# Altium PCB VC Pcb.PcbDoc
Units mm, origin at the board's own origin, x right, y up, seen from the top; angles counter-clockwise.
Board outline 105 x 73 mm, 4 copper layers (Top Layer, GND, 3V3, Bottom Layer), stack 1.248 mm thick; 33 components, 36 nets, 120 pads, 0 vias.
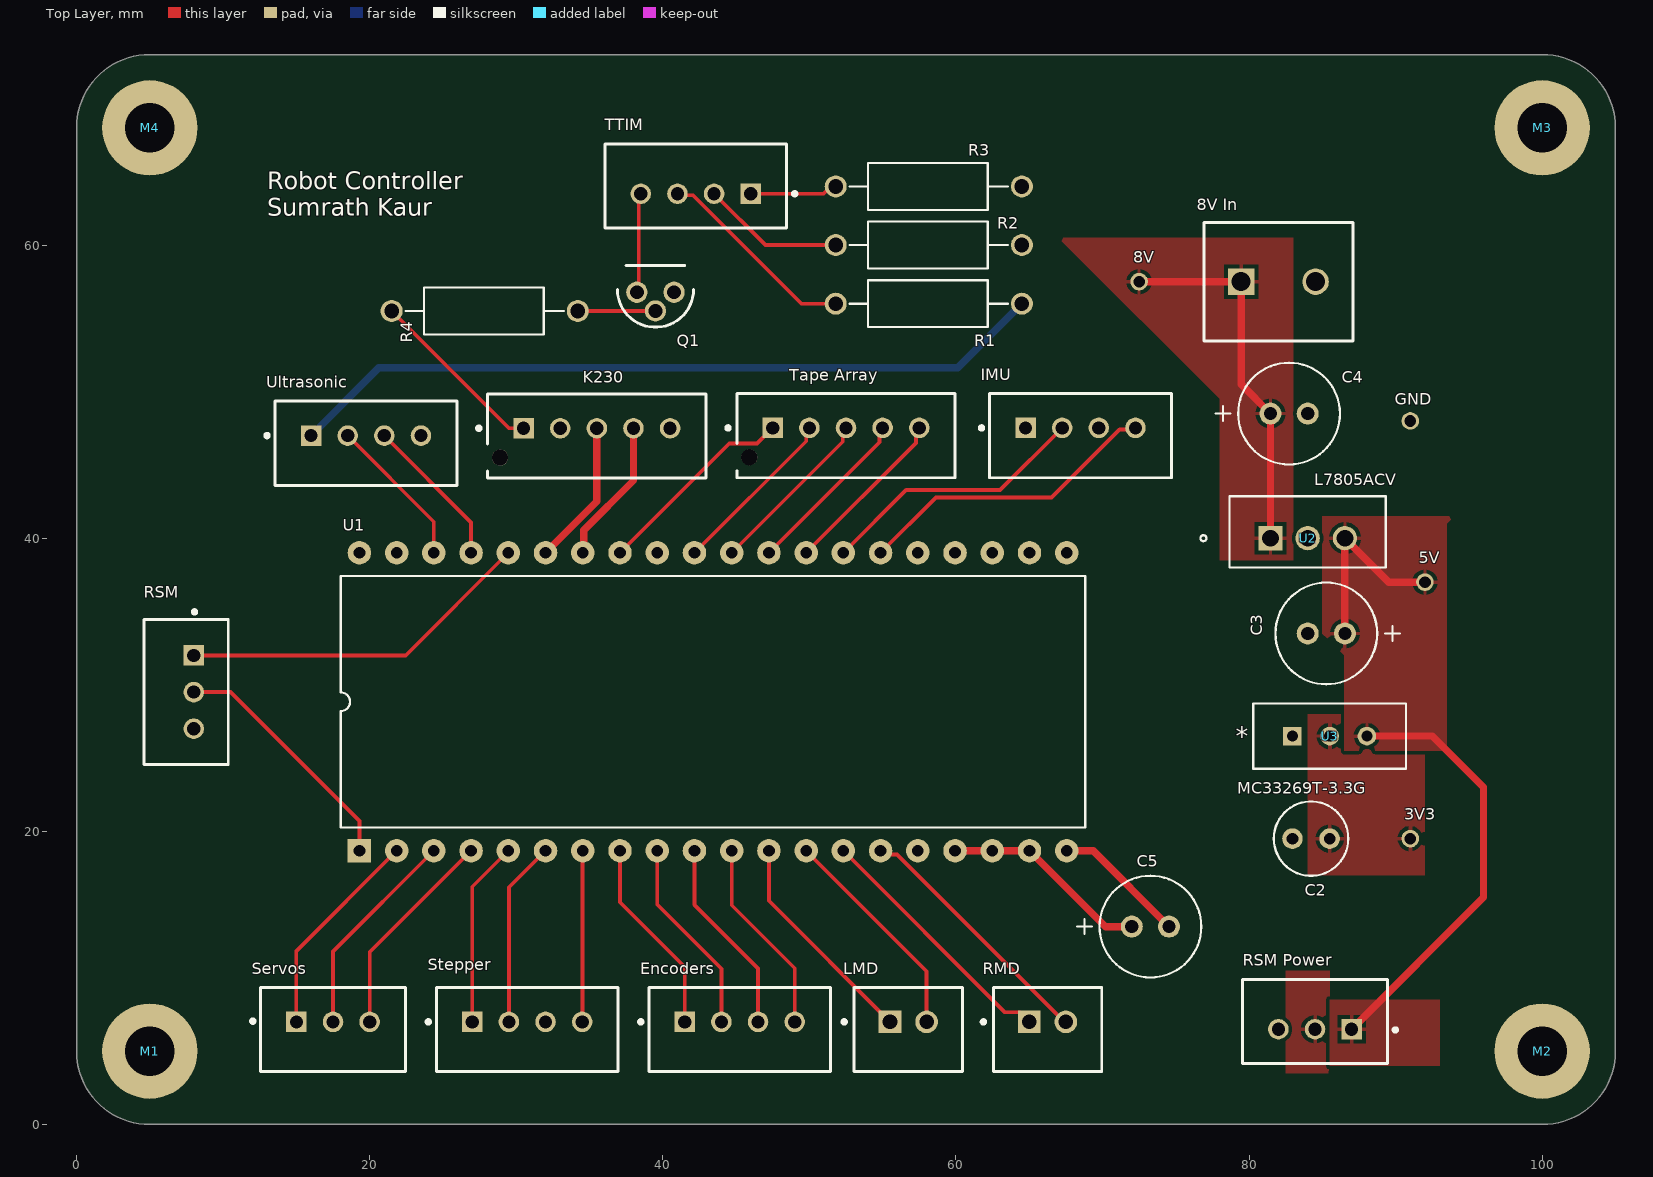
[diagram p0: Top Layer view]
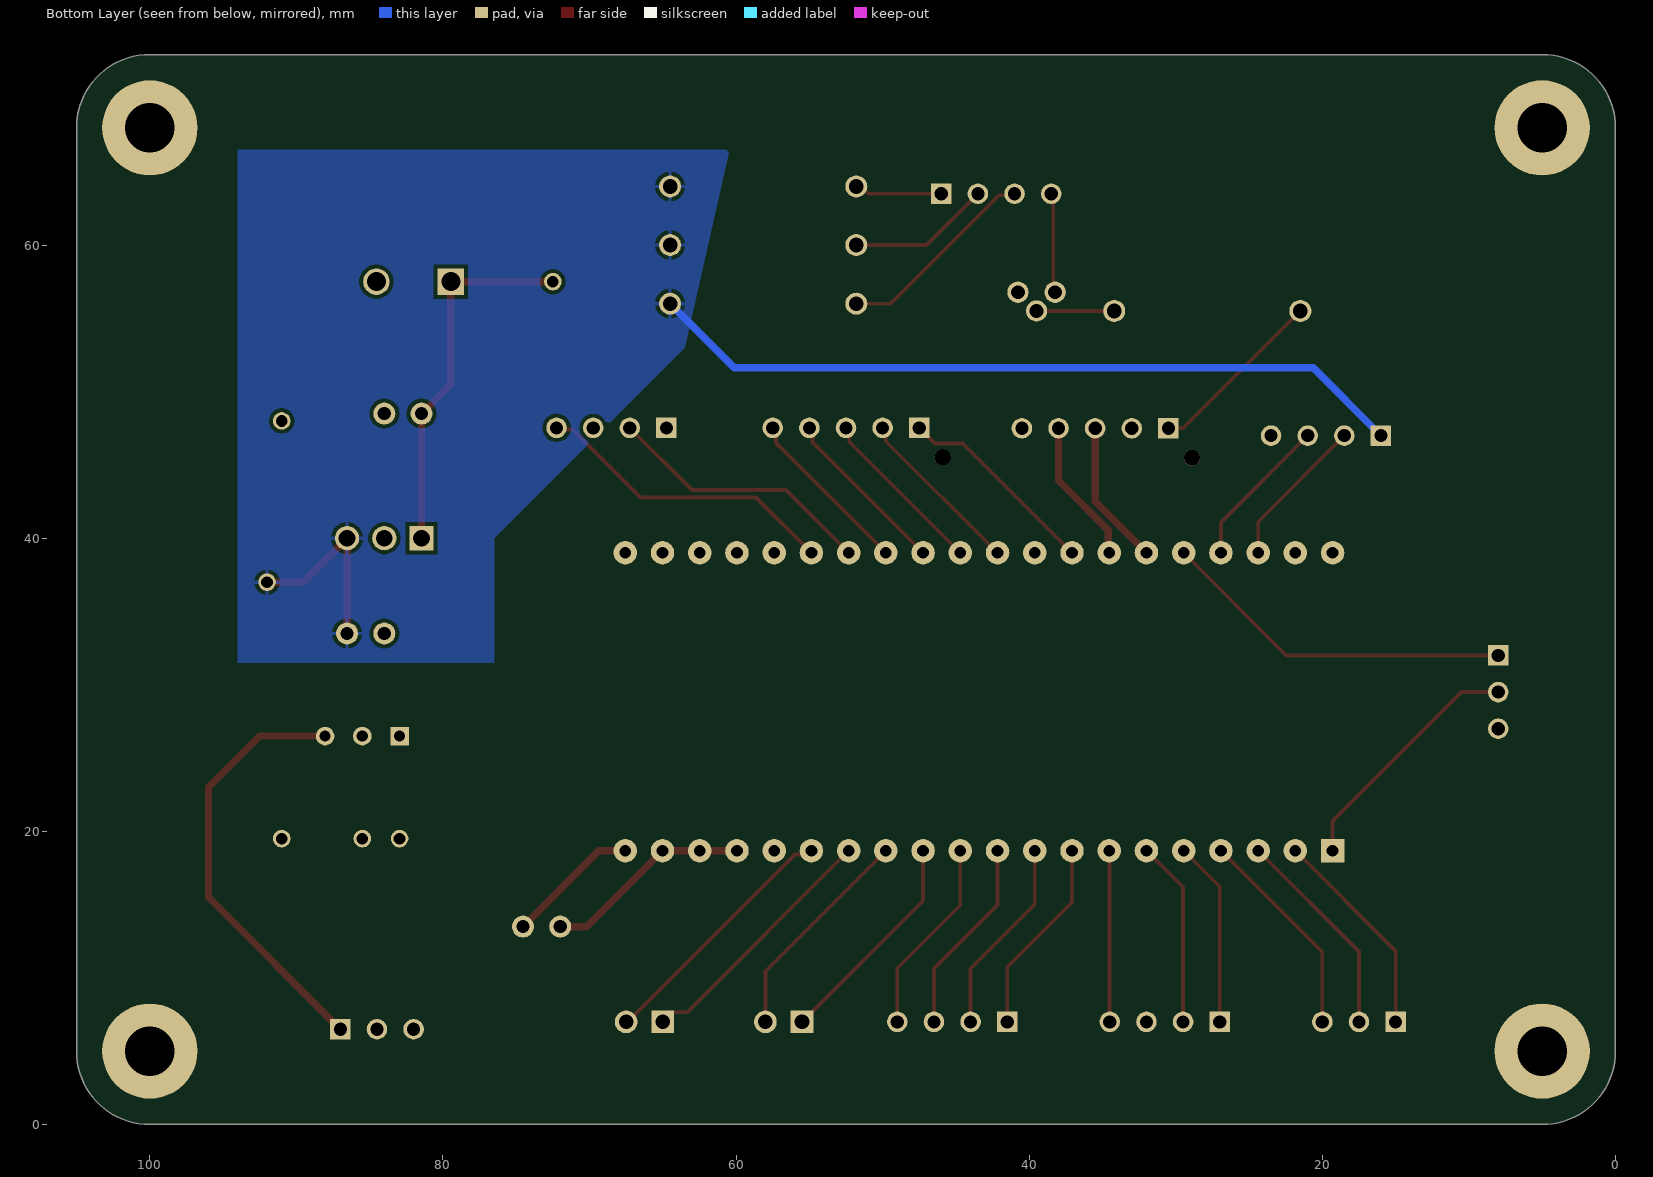
[diagram p1: Bottom Layer view, seen from below]
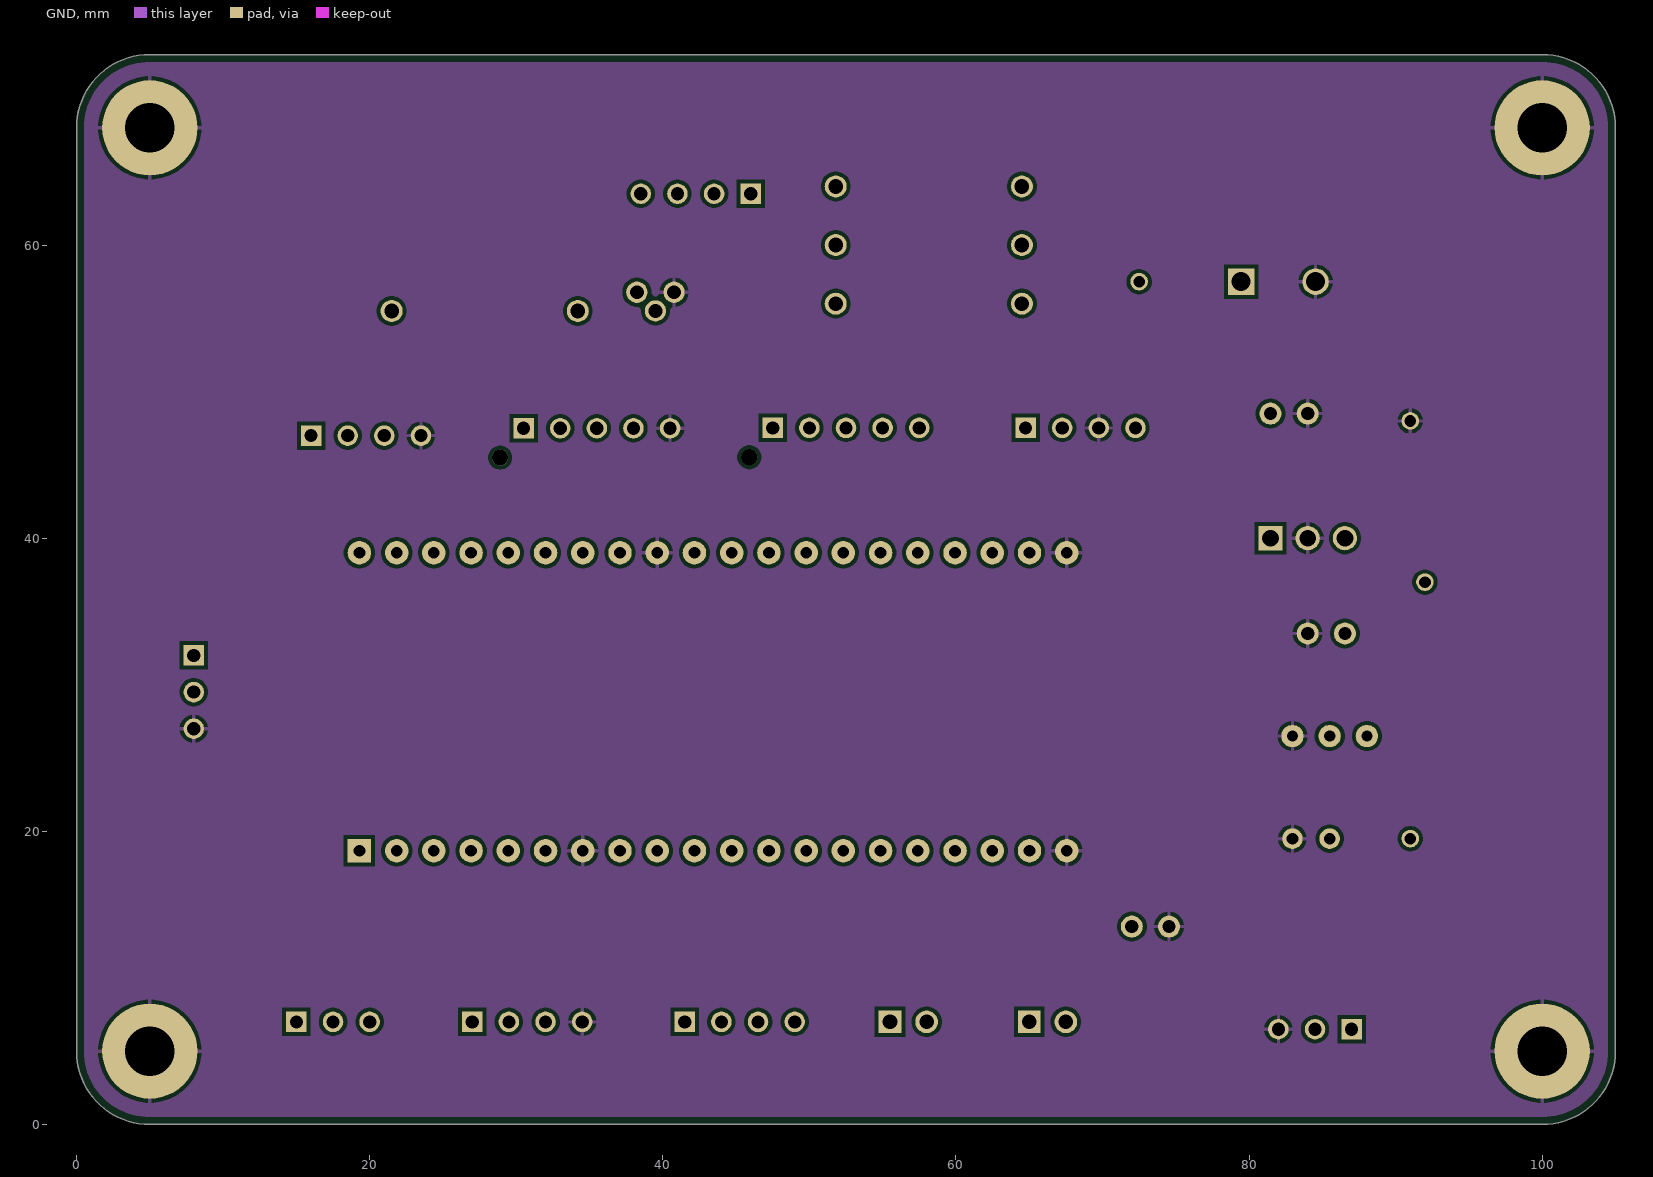
[diagram p2: GND]
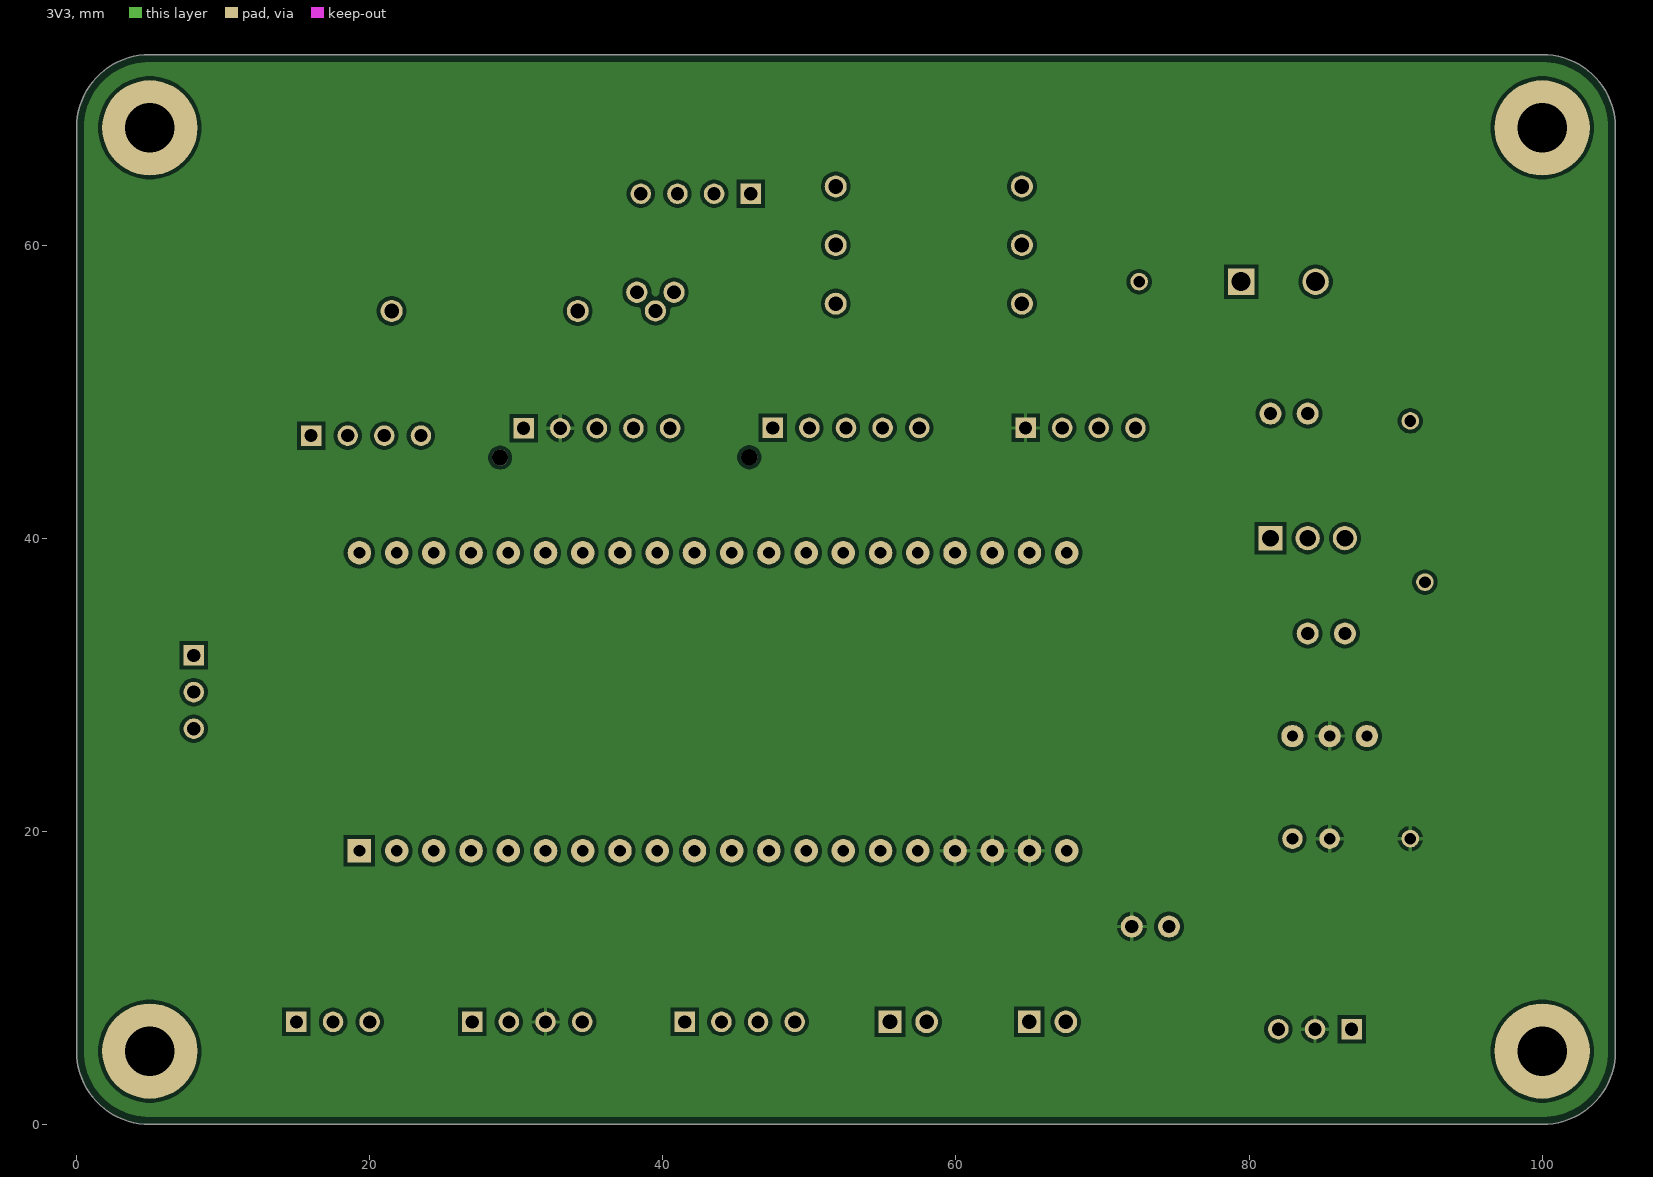
[diagram p3: 3V3]
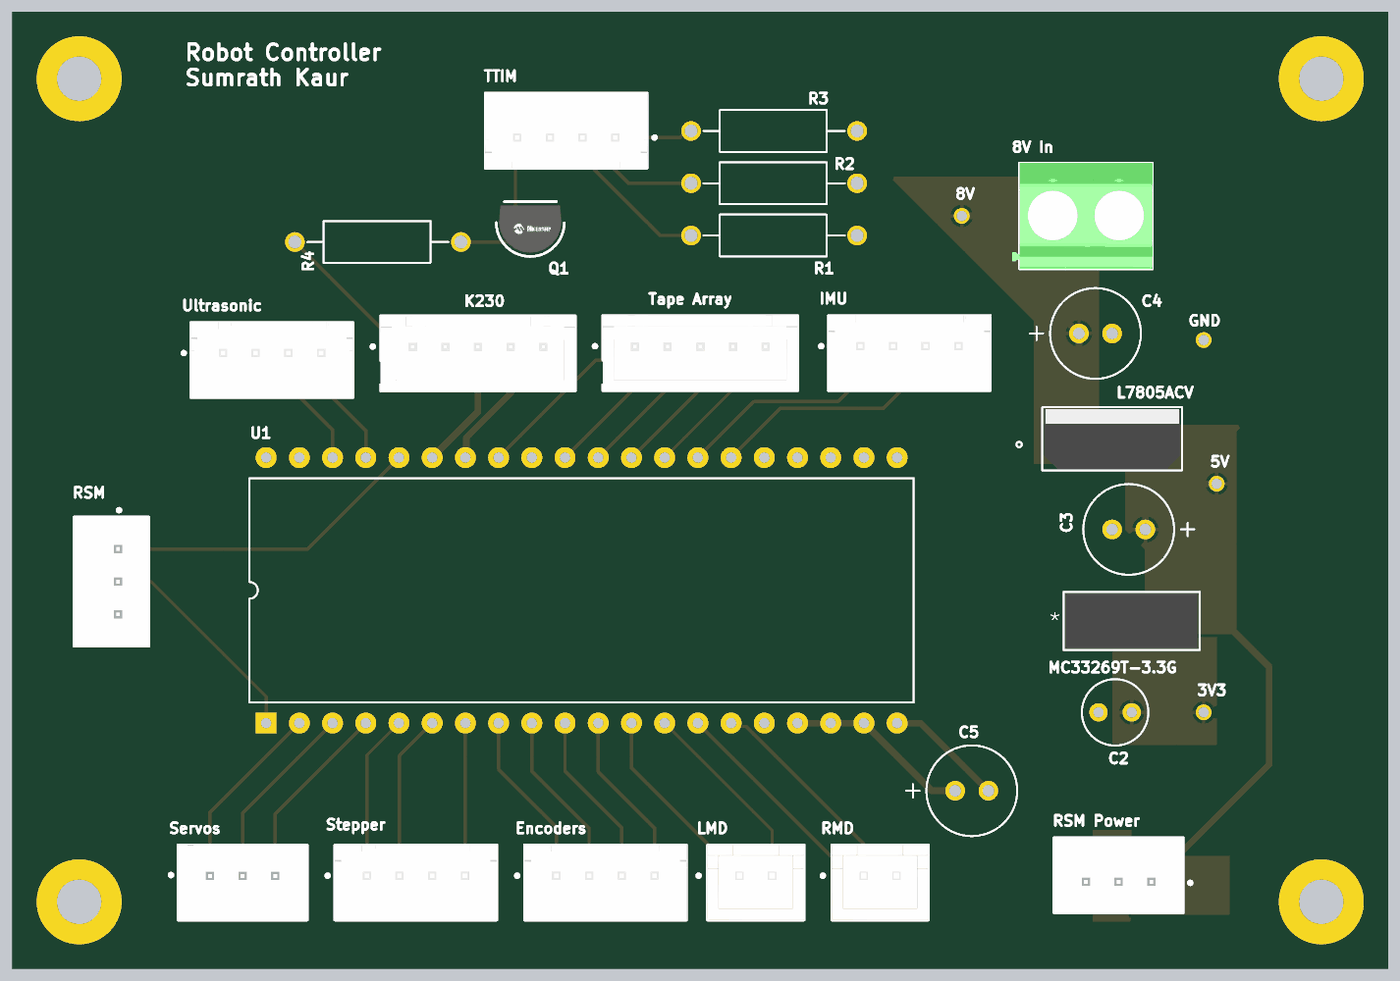
[diagram p4: 3D render of the assembled board from above, using the file's embedded part models]

## Layer stack, top to bottom
Top Solder: solder mask 0.0102, Solder Resist, Dk 3.5
Top Layer: signal copper 0.0356
Dielectric 2: prepreg 0.0711, PP-006, Dk 4.1
GND: signal copper 0.0175
Dielectric 1: dielectric 1, FR-4, Dk 4.8
3V3: signal copper 0.0175
Dielectric 3: prepreg 0.0711, PP-006, Dk 4.1
Bottom Layer: signal copper 0.0356
Bottom Solder: solder mask 0.0102, Solder Resist, Dk 3.5

## Board outline
5,0 cw(c5,5) 0,5 0,68 cw(c5,68) 5,73 100,73 cw(c100,68) 105,68 105,5 cw(c100,5) 100,0

## Design rules (kind name [scope] priority, off if disabled: settings)
BoardOutlineClearance [All] p1: gap=0.5 ignorepadtopadclearanceinfootprint=FALSE
Clearance [All] p1: gap=0.254 ignorepadtopadclearanceinfootprint=FALSE
PolygonConnect [All] p1: connectstyle=Relief reliefconductorwidth=0.254 reliefentries=4 polygonreliefangle="90 Angle" airgapwidth=0.254
RoutingVias [All] p1: holewidth=0.711 width=1.27 viastyle="Through Hole" minholewidth=0.711 minwidth=1.27 maxholewidth=0.711 maxwidth=1.27
SolderMaskExpansion [All] p1: expansion=0 istentingtop=FALSE
SupplyNets "Schematic Supply Nets_4" [InNet('3V3')] p1: voltage=0.000
SupplyNets "Schematic Supply Nets_2" [InNet('8V')] p2: voltage=0.000
SupplyNets "Schematic Supply Nets_1" [InNet('5V')] p3: voltage=0.000
SupplyNets "Schematic Supply Nets" [InNet('GND')] p4: voltage=0.000
Width [All] p1: maxlimit=0.5 minlimit=0.254 preferedwidth=0.254
30 further rules are at their usual default settings.

## Classes and differential pairs
component class "Top Level": C2 C3 C4 C5 GND Q1 R1 R2 R3 R4 U1 U2 U3

## Components (designator, comment, footprint, x,y, rotation, side; value= is the part's Value field where it differs from the comment)
3V3 "3V3" TESTPOINT 91,19.5 r180 top (schematic designator TP3)
5V "5V" TESTPOINT 92,37 r180 top (schematic designator TP2)
8V "8V" TESTPOINT 72.5,57.5 r180 top (schematic designator TP1)
"8V In" "1729128" PHOE-1729128-2_V 82,57.5 r0 top (schematic designator J13)
C2 "100 nF" "Generic small capacitor" 85.5,19.5 r180 top
C3 "470 nF" "small electrolytic cap" 86.54,33.5 r180 top
C4 "470 nF" "small electrolytic cap" 81.46,48.5 r0 top
C5 "470 nF" "small electrolytic cap" 72,13.5 r0 top
Encoders "Encoders" FP-B4B-XH-A_LF_SN-MFG 45.25,6.475 r180 top (schematic designator J1)
GND "GND" TESTPOINT 91,48 r90 top (schematic designator TP4)
IMU "IMU" FP-B4B-XH-A_LF_SN-MFG 68.5,47 r180 top (schematic designator J7)
K230 "K230" FP-B5B-XH-AM_LF_SN-MFG 35.5,46.975 r180 top (schematic designator J10)
LMD "LMD" FP-B2B-XH-A_LF_SN-MFG 56.75,6.475 r0 top (schematic designator J4)
M1 "M3 Mounting Hole Plated" "M3 Screw Hole - Plated" 5,5 r0 top
M2 "M3 Mounting Hole Plated" "M3 Screw Hole - Plated" 100,5 r0 top
M3 "M3 Mounting Hole Plated" "M3 Screw Hole - Plated" 100,68 r0 top
M4 "M3 Mounting Hole Plated" "M3 Screw Hole - Plated" 5,68 r0 top
Q1 "VN2222LL-G" FP-VN2222LL-G-MFG 39.5,56.5 r0 top
R1 "100R" "Axial 0.5" 64.5,56 r180 top
R2 "100R" "Axial 0.5" 64.5,60 r180 top
R3 "100R" "Axial 0.5" 64.5,64 r180 top
R4 "47R" "Axial 0.5" 34.2,55.5 r180 top
RMD "RMD" FP-B2B-XH-A_LF_SN-MFG 66.25,6.475 r0 top (schematic designator J5)
RSM "RSM" FP-B3B-XH-A_LF_SN-MFG 7.475,29.5 r270 top (schematic designator J9)
"RSM Power" "RSM Power" FP-B3B-XH-A_LF_SN-MFG 84.5,7.025 r180 top (schematic designator J3)
Servos "Servos" FP-B3B-XH-A_LF_SN-MFG 17.5,6.475 r0 top (schematic designator J2)
Stepper "Stepper" FP-B4B-XH-A_LF_SN-MFG 30.75,6.475 r180 top (schematic designator J6)
"Tape Array" "Tape Signals" FP-B5B-XH-AM_LF_SN-MFG 52.5,47 r180 top (schematic designator J11)
TTIM "TTIM" FP-B4B-XH-A_LF_SN-MFG 42.25,64.025 r0 top (schematic designator J12)
U1 "ESP32-S3" esp32 19.3,18.68 r90 top
U2 "L7805ACV" TO-220_STM 81.46,40 r0 top
U3 "MC33269T-3.3G" MC33269T-33 82.96,26.5 r0 top
Ultrasonic "Ultrasonic" FP-B4B-XH-A_LF_SN-MFG 19.75,46.475 r180 top (schematic designator J8)

## Footprints (in the part's own frame and the unit in brackets; to place one, negate y for a bottom-side part, rotate by r counter-clockwise, add the part's x,y. Pads: shape width x height; smd on the part's side, far side on the other; paste and mask are expansions set on the pad)
"Axial 0.5" [mm]
  round 1.5 hole 1: 1(0,0) 2(12.7,0)
  silkscreen extent 0.95,-1.6 11.75,1.6
esp32 [mm]
  rect 1.6x1.6 hole 0.8: 1(0,0)
  round 1.6 hole 0.8: 2(0,-2.54) 3(0,-5.08) 4(0,-7.62) 5(0,-10.16) 6(0,-12.7) 7(0,-15.24) 8(0,-17.78) 9(0,-20.32) 10(0,-22.86) 11(0,-25.4) 12(0,-27.94) 13(0,-30.48) 14(0,-33.02) 15(0,-35.56) 16(0,-38.1) 17(0,-40.64) 18(0,-43.18) 19(0,-45.72) 20(0,-48.26) 21(20.32,-48.26) 22(20.32,-45.72) 23(20.32,-43.18) 24(20.32,-40.64) 25(20.32,-38.1) 26(20.32,-35.56) 27(20.32,-33.02) 28(20.32,-30.48) 29(20.32,-27.94) 30(20.32,-25.4) 31(20.32,-22.86) 32(20.32,-20.32) 33(20.32,-17.78) 34(20.32,-15.24) 35(20.32,-12.7) 36(20.32,-10.16) 37(20.32,-7.62) 38(20.32,-5.08) 39(20.32,-2.54) 40(20.32,0)
  silkscreen extent 1.58,-49.53 18.74,1.27
FP-B2B-XH-A_LF_SN-MFG [mm]
  rect 1.55x1.55 hole 1 paste-2539.97 mask+0: 1(-1.25,0.525)
  round 1.55 hole 1 paste-2539.97 mask+0: 2(1.25,0.525)
  silkscreen extent -4.5,-2.88 3.7,2.88, body extent -3.8,-2.98 3.8,2.98, height 0.25
FP-B3B-XH-A_LF_SN-MFG [mm]
  rect 1.4x1.4 hole 0.9 paste-2539.97 mask+0: 1(-2.5,0.525)
  round 1.4 hole 0.9 paste-2539.97 mask+0: 2(0,0.525) 3(2.5,0.525)
  silkscreen extent -5.6,-2.88 4.95,2.88, body extent -5.05,-2.98 5.05,2.98, height 0.25
FP-B4B-XH-A_LF_SN-MFG [mm]
  rect 1.4x1.4 hole 0.9 paste-2539.97 mask+0: 1(3.75,-0.525)
  round 1.4 hole 0.9 paste-2539.97 mask+0: 2(1.25,-0.525) 3(-1.25,-0.525) 4(-3.75,-0.525)
  silkscreen extent -6.2,-2.88 6.87,2.88, body extent -6.3,-2.98 6.3,2.98, height 0.25
FP-B5B-XH-AM_LF_SN-MFG [mm]
  rect 1.4x1.4 hole 0.9 paste-2539.97 mask+0: 1(5,-0.525)
  round 1.4 hole 0.9 paste-2539.97 mask+0: 2(2.5,-0.525) 3(0,-0.525) 4(-2.5,-0.525) 5(-5,-0.525)
  round 1.1 hole 1.1 unplated paste-2539.97 mask+0: ""(6.6,1.475)
  silkscreen extent -7.45,-2.88 8.17,2.88, body extent -7.55,-2.98 7.55,2.98, height 0.25
FP-VN2222LL-G-MFG [mm]
  round 1.45 hole 0.95 paste-2539.97 mask+0: 1(1.27,0.279) 2(0,-0.991) 3(-1.27,0.279)
  silkscreen extent -2.6,-2.1 2.6,2.1, body extent -2.7,-2.2 2.7,2.2, height 0.25
"Generic small capacitor" [mm]
  round 1.4 / inner round 1.4 / far side round 1.2 hole 0.8: 1(0,0) 2(2.54,0)
  silkscreen extent -1.27,-2.54 3.81,2.54
"M3 Screw Hole - Plated" [mm]
  round 6.5 hole 3.4: 1(0,0)
MC33269T-33 [mil]
  rect 50x50 / inner round 60 / far side rect 50x50 hole 30 paste-99999 mask+0: 1(0,0)
  round 50 / inner round 60 / far side round 50 hole 30 paste-99999 mask+0: 2(100,0) 3(200,0)
  silkscreen extent -105,-88 305,88, body extent -100,-83 300,83, height 625
PHOE-1729128-2_V [mm] "Receptacle, 2-Leads, Body 8.1x10.16mm, Pitch 5.08mm"
  rect 1.8x1.8 hole 1.3: 1(-2.54,0)
  round 1.8 hole 1.3: 2(2.54,0)
  silkscreen extent -5.08,-4.05 5.08,4.05, body extent -5.65,-4.05 5.08,4.05, height 10.01
"small electrolytic cap" [mm]
  round 1.5 hole 0.9: 1(0,0) 2(2.54,0)
  silkscreen extent -3.75,-3.47 4.74,3.47
TESTPOINT [mm] "Testpoint"
  round 1.2 hole 0.8 paste-2539.97: 1(0,0)
TO-220_STM [mil]
  rect 65x65 hole 45 paste-99999 mask-32.5: 1(0,0)
  round 65 hole 45 paste-99999 mask-32.5: 2(100,0) 3(200,0)
  silkscreen extent -188,-78 310,112, body extent -105,-74 305,108, height 776

## Part data
3V3 5V 8V GND: library part CMP-020-0000-4, Design Item ID="Thru-Hole Test Point", Source="UBC Formula Electric.SchLib"
"8V In": library part CMP-2000-05815-1, "PCB Terminal Block, 13.5 A, 400 V, 2-Pin THD, RoHS, Bulk", Current Rating=13500mA, Manufacturer="Phoenix Contact", Package Description="2-Pin Through Hole Device, Body 8.1 x 10.16 mm, Pitch 5.08 mm", Package Reference=1729128-2, Package Version=03/2015, Voltage Rating=400V, Datasheet URL=https://datasheet.ciiva.com/16046/1729128-16046181.pdf, Datasheet Version=12/2013, Manufacturer URL=http://www.phoenixcontact.com/, Mounting Technology=ThroughHole, No. of Positions=2, No. of Rows=1, Orientation=Horizontal, Package URL=https://www.phoenixcontact.com/online/portal/pi/pxc/product_detail_page/!ut/p/b1/3VdJjqNKFDxLH8AFycySyWY2ozFsEPOMMQaDOX1XedGL_1Vdm5YXJleknhSKeBkvI6EA8ncAo3AYoDhBQGco6KN7VURTdemj9us_IEKEZo_YHiPAEWEFmDGOHMORkqKYCORBZxgL7ZoaZYcbFFUZ3fqxSY6GOuxydWUuHqz1ynmMFygu583Bob0Ewr6Sd_l-5m-kAueHiB0jpRwZwe58wwtkpxtMYd_LmGcDRU02dRNEyWt6Y2ti5pSyJ_reIkzIulrqApdnbT11V5jnCKbYNCvhEM1MCpPByat_X379-iThf08CI5GfOPqfBeS3BRoBOdD55AKVv0iLwCMq-2BrzXWSGRH7pUGD9uwXQjiph3xL0DKQwdGa0JImiIOmBNOestqgwTHSSs2oOep-78apyXQBvNi8ZLaFjvjWvcaUEBu0MC6Wbe-d6mB0FAebo2lUWinqYaZs5DAYzV0RP9yitUjnGJ0iI9xhZkT42OCQNUJJhkgWINNQLP2JFP6OpMg3JCVg70jqHT0lvKOnhHf0lPuOnnLf0VPuWx6_dxwUIvwk5WMkT0kLL1mh61l2yZVSzG3pYV_bqo-mj6uMKwKwdnnW8Jh5RTOJzMOA5c-eJDaZQw4mTMPH02PvS_ZAqNVjVTo2WyYLkwH_KU1mmmG5kjRhDqPXLwwVHvVOjCM60-fpXvTDfMGW1PVFVS1r4e4yVDk4ZdNbkUHvqPqQSeian4UD39fNKmachqdJ1NJbyk8rXT9mXTvPk3oE5meulKGgiruPJek-4I9hTT6G8ZLOyRSm2RRVbThERQad5OS28hdt4YW4vG0stgYYzsWsK4_7y6DZMjJSCqri1kyiZR5vD7pwIrNR7QwPHTcLTI5qT7eRlpHrdGiupYlqQDJ7zy_CND8fWWBoLRXxk1RVcXiBQwbTD4Xi7KL-FuO94t9xaqweXzH, Packing=Bulk, PartNumber=1729128, Pitch=5.08mm, RoHS=TRUE
C2: library part CAP_GENERIC
C3 C4 C5: library part "electrolytic cap"
Encoders IMU Stepper TTIM Ultrasonic: library part CMP-17439-000250-1, "CONN HEADER VERT 4POS 2.5MM", Color=Natural, Contact Resistance=20mR, Current Rating=3A, Flammability Rating="UL94 V-0", Housing Color=White, Insulation Resistance=1GR, Max Operating Temperature=85°C, Max Voltage Rating (AC)=250V, Min Operating Temperature=-25°C, Package Quantity=500, Connector Type=Header, Contact Finish - Mating=TIN, Contact Material=Brass, Contact Plating=Tin, Contact Shape=Square, Contact Type="Male Pin", Depth=5.75mm, Fastening Type=Detent, Gender=Male, Housing Material=Polyamide, Insulation Color=Natural, Insulation Material=Nylon, Lead Free="Lead Free", Lead Pitch=2.5mm, Length=12.4mm, Mated Stacking Heights=9.8mm, Material=Polyamide, Max Current Rating=3A, Max Voltage Rating (DC)=250V, Mount="Through Hole", Number of Contacts=4, Number of Positions=4, Number of Rows=1, Orientation=Straight, Packaging=Bulk, Pitch=2.5mm, REACH SVHC="No SVHC", Series=XH, Termination=Solder, Voltage Rating=250V, Voltage Rating (AC)=250V, Wire/Cable Gauge=22AWG
K230 "Tape Array": library part CMP-17439-000304-1, "CONN HEADER VERT 5POS 2.5MM", Color=Green, Contact Resistance=20mR, Flammability Rating="UL94 V-0", Housing Color=White, Insulation Color=Natural, Max Current Rating=3A, Max Operating Temperature=85°C, Max Voltage Rating (AC)=250V, Min Operating Temperature=-25°C, Connector Type=Header, Contact Finish - Mating=TIN, Contact Material=Brass, Contact Plating=Copper, Contact Shape=Square, Contact Type="Male Pin", Depth=5.75mm, Fastening Type=Detent, Housing Material=Polyamide, Insulation Material=Nylon, Lead Free="Lead Free", Length=14.9mm, Mated Stacking Heights=9.8mm, Mount="Through Hole", Number of Positions=5, Number of Rows=1, Orientation=Straight, Packaging=Bulk, Pitch=2.5mm, Series=XH, Termination=Solder, Voltage Rating=250V
LMD RMD: library part CMP-2000-05888-3, "CONN HEADER VERT 2POS 2.5MM", Color=Natural, Contact Resistance=20mR, Current Rating=3A, Housing Color=White, Insulation Resistance=1GR, Max Operating Temperature=85°C, Max Voltage Rating (AC)=250V, Min Operating Temperature=-25°C, Connector Type="Male Pin", Contact Material=Brass, Contact Plating=Tin, Contact Type="Male Pin", Depth=5.75mm, Fastening Type=Detent, Housing Material=Polyamide, Lead Free="Lead Free", Lead Pitch=2.5mm, Length=7.4mm, Max Current Rating=3A, Max Voltage Rating (DC)=250V, Mount="Through Hole", Number of Contacts=2, Number of Positions=2, Number of Rows=1, Orientation=Straight, Packaging=Bulk, Pitch=2.5mm, REACH SVHC="No SVHC", Series=XH, Termination=Solder, Voltage Rating=250V, Voltage Rating (AC)=250V, Wire/Cable Gauge=22AWG
M1 M2 M3 M4: library part CMP-019-000000-3, Design Item ID="M3 Mounting Hole Plated", Source="UBC Formula Electric.SchLib"
Q1: library part CMP-06369-000005-1, "MOSFET N-CH 60V 0.23A TO92-3", Case/Package=TO-92, Continuous Drain Current (ID)=230mA, Drain to Source Breakdown Voltage=60V, Drain to Source Resistance=7.5R, Gate to Source Voltage (Vgs)=30V, Max Operating Temperature=150°C, Min Operating Temperature=-55°C, Package Quantity=1000, Power Dissipation=1W, Element Configuration=Single, Lead Free="Lead Free", Mount="Through Hole", Number Of Elements=1, Number of Pins=3, Packaging=Bulk, Radiation Hardening=No
R1 R2 R3 R4: library part RES_GENERIC
RSM "RSM Power" Servos: library part CMP-17439-000014-3, "CONN HEADER VERT 3POS 2.5MM", Color=Natural, Contact Resistance=20mR, Current Rating=3A, Flammability Rating="UL94 V-0", Housing Color=White, Insulation Resistance=1GR, Max Operating Temperature=85°C, Max Voltage Rating (AC)=250V, Min Operating Temperature=-25°C, Connector Type=Header, Contact Finish - Mating=TIN, Contact Material=Brass, Contact Plating=Tin, Contact Shape=Square, Contact Type="Male Pin", Depth=5.75mm, Fastening Type=Detent, Gender=Male, Housing Material=Polyamide, Insulation Color=Natural, Insulation Material=Nylon, Lead Free="Lead Free", Lead Pitch=2.5mm, Length=9.9mm, Max Current Rating=3A, Max Voltage Rating (DC)=250V, Mount="Through Hole", Number of Contacts=3, Number of Positions=3, Number of Rows=1, Orientation=Straight, Packaging=Bulk, Pitch=2.5mm, REACH SVHC="No SVHC", Series=XH, Termination=Solder, Voltage Rating=250V, Voltage Rating (AC)=250V, Wire/Cable Gauge=22AWG
U1: library part esp32-s3
U2: "Positive voltage regulator ICs", Manufacturer_Name=STMicroelectronics, Copyright="Copyright (C) 2026 Ultra Librarian. All rights reserved.", Manufacturer_Part_Number=L7805ACV, RefDes=RefDes, Type=Type
U3: "Description", Manufacturer_Name=onsemi, Copyright="Copyright (C) 2025 Ultra Librarian. All rights reserved.", Manufacturer_Part_Number=MC33269T-3.3G, RefDes=RefDes, Type=Type

## Nets (pads, with @x,y where several pads share a name; then routed paths per layer and width w, separated by ;. In a path a pad name is that pad's centre, name@x,y a point inside that pad or via, vN(x,y) a via of type N, cw(c..) or ccw(c..) an arc to the next point about the centre after c; other vN are vias at no path point)
3V3: 3V3.1 "RSM Power.2" C2.1 C5.1 IMU.1 K230.2 Stepper.3 U1.17 U1.18 U1.19 U3.2 | length 14.2
  Top Layer w0.5: U1.17 U1.18 U1.19 70.2,13.5 C5.1
5V: 5V.1 "RSM Power.1" C3.1 R1.1 R2.1 R3.1 U2.3 U3.3 Ultrasonic.1 | length 95.1
  Top Layer w0.5: C3.1 U2.3 89.54,37 5V.1 ; 87,6.5 96,15.5 96,23 92.5,26.5 U3.3
  Bottom Layer w0.5: Ultrasonic.1 20.629,51.629 60.129,51.629 R1.1
8V: 8V.1 "8V In.1" C4.1 U2.1 | length 25.3
  Top Layer w0.5: 8V.1 79.46,57.5 79.46,50.5 C4.1 U2.1
BEACON_ADC: RSM.1 U1.36 | length 24.4
  Top Layer w0.254: RSM.1 22.46,32 U1.36
DETECT: K230.1 R4.2 | length 12.3
  Top Layer w0.254: R4.2 29.5,47.5 K230.1
DIR: Stepper.2 U1.6 | length 12.7
  Top Layer w0.254: Stepper.2 29.5,16.18 U1.6
ECHO: U1.37 Ultrasonic.3 | length 10.5
  Top Layer w0.254: Ultrasonic.3 26.92,41.08 U1.37
GND: "8V In.2" "RSM Power.3" C2.2 C3.2 C4.2 C5.2 GND.1 IMU.3 K230.5 M1.1 M2.1 M3.1 M4.1 Q1.1 RSM.3 Stepper.4 U1.7 U1.20 U1.21 U1.32 U2.2 U3.1 Ultrasonic.4 | length 20.8
  Top Layer w0.254: Stepper.4 34.52,7.02 34.52,18.66 U1.7
  Top Layer w0.5: U1.20 69.36,18.68 C5.2
K230_UART_RX: K230.4 U1.34 | length 9.9
  Top Layer w0.5: U1.34 34.616,39.076 34.616,40.55 38,43.934 K230.4
K230_UART_TX: K230.3 U1.35 | length 9.9
  Top Layer w0.5: U1.35 35.5,42.5 K230.3
LMD_A: Encoders.1 U1.8 | length 13.5
  Top Layer w0.254: U1.8 37.08,15.154 41.5,10.734 Encoders.1
LMD_B: Encoders.2 U1.9 | length 13.5
  Top Layer w0.254: U1.9 39.62,15.003 44,10.623 Encoders.2
LMD_PWM_0: LMD.1 U1.12 | length 15.1
  Top Layer w0.254: U1.12 47.24,15.26 LMD.1
LMD_PWM_1: LMD.2 U1.13 | length 15.1
  Top Layer w0.254: U1.13 58,10.46 LMD.2
NetJ12_1: R3.2 TTIM.1 | length 6
  Top Layer w0.254: TTIM.1 50.963,63.5 51.463,64 R3.2
NetJ12_2: R2.2 TTIM.2 | length 9.7
  Top Layer w0.254: TTIM.2 47,60 R2.2
NetJ12_3: R1.2 TTIM.3 | length 13.9
  Top Layer w0.254: TTIM.3 41.11,63.39 42.081,63.39 49.471,56 R1.2
NetJ12_4: Q1.3 TTIM.4 | length 6.8
  Top Layer w0.254: Q1.3 38.365,56.914 38.365,63.365 TTIM.4
NetQ1_2: Q1.2 R4.1 | length 5.3
  Top Layer w0.254: R4.1 34.205,55.505 39.495,55.505 Q1.2
OSCILLATOR_SIGNAL: RSM.2 U1.1 | length 17
  Top Layer w0.254: RSM.2 10.5,29.5 19.3,20.7 U1.1
RMD_A: Encoders.3 U1.10 | length 13.5
  Top Layer w0.254: U1.10 42.16,14.983 46.5,10.643 Encoders.3
RMD_B: Encoders.4 U1.11 | length 13.5
  Top Layer w0.254: U1.11 44.7,14.963 49,10.663 Encoders.4
RMD_PWM_0: RMD.1 U1.14 | length 17.5
  Top Layer w0.254: U1.14 63.352,7.648 64.352,7.648 RMD.1
RMD_PWM_1: RMD.2 U1.15 | length 17.5
  Top Layer w0.254: U1.15 55.118,18.422 55.987,18.422 67.41,7 RMD.2
SCL: IMU.4 U1.26 | length 20.9
  Top Layer w0.254: U1.26 58.634,42.774 66.527,42.774 71.169,47.415 72.14,47.415 IMU.4
SDA: IMU.2 U1.27 | length 18.5
  Top Layer w0.254: U1.27 56.602,43.282 63.007,43.282 IMU.2
SERVO_1_PWM: Servos.1 U1.2 | length 14.5
  Top Layer w0.254: Servos.1 15,11.84 U1.2
SERVO_2_PWM: Servos.2 U1.3 | length 14.5
  Top Layer w0.254: Servos.2 17.5,11.8 U1.3
SERVO_3_PWM: Servos.3 U1.4 | length 14.5
  Top Layer w0.254: Servos.3 20,11.76 U1.4
STEP: Stepper.1 U1.5 | length 12.7
  Top Layer w0.254: Stepper.1 27,16.22 U1.5
TAPE_SIGNAL_1: "Tape Array.1" U1.33 | length 14
  Top Layer w0.254: U1.33 44.536,46.456 46.431,46.456 47.5,47.525
TAPE_SIGNAL_2: "Tape Array.2" U1.31 | length 11.8
  Top Layer w0.254: U1.31 49.781,46.621 49.781,47.306 50,47.525
TAPE_SIGNAL_3: "Tape Array.3" U1.30 | length 11.8
  Top Layer w0.254: U1.30 52.281,46.581 52.281,47.306 52.5,47.525
TAPE_SIGNAL_4: "Tape Array.4" U1.29 | length 11.7
  Top Layer w0.254: U1.29 54.781,46.541 54.781,47.306 55,47.525
TAPE_SIGNAL_5: "Tape Array.5" U1.28 | length 11.7
  Top Layer w0.254: U1.28 57.281,46.501 57.281,47.306 57.5,47.525
TRIG: U1.38 Ultrasonic.2 | length 10.4
  Top Layer w0.254: Ultrasonic.2 24.38,41.12 U1.38
pads on no net: "Tape Array." K230. U1.16 U1.22 U1.23 U1.24 U1.25 U1.39 U1.40

## Polygon pours and split planes (outlines as drawn)
3V3 on Top Layer "3V3_L01_P006" (solid, remove dead copper, pour order 6): 82.5,10.5 85.5,10.5 85.5,3.5 82.5,3.5
5V on Top Layer "5V_L01_P005" (solid, remove dead copper, pour order 5): 85.5,8.5 93,8.5 93,4 85.5,4
3V3 on Top Layer "3V3_L01_P004" (solid, remove dead copper, pour order 4): 84,28 92,28 92,17 84,17
5V on Top Layer "5V_L01_P002" (solid, remove dead copper, pour order 2): 85,41.5 94,41.5 93.5,41 93.5,25.5 86.5,25.5 86.5,32 85,33.5
8V on Top Layer "8V_L01_P000" (solid, remove dead copper, pour order 0): 67,60.5 83,60.5 83,38.5 78,38.5 78,49.5
5V on Bottom Layer "5V_L04_P007" (solid, remove dead copper, pour order 7): 60.452,66.5 94,66.5 94,31.5 84.5,31.5 76.5,31.5 76.5,40 63.5,53
3V3 on 3V3 "3V3_L03_P008" (solid, remove dead copper, pour order 8): 5,0 cw(c5,5) 0,5 0,68 cw(c5,68) 5,73 100,73 cw(c100,68) 105,68 105,5 cw(c100,5) 100,0
GND on GND "GND_L02_P009" (solid, remove dead copper, pour order 9): 5,0 cw(c5,5) 0,5 0,68 cw(c5,68) 5,73 100,73 cw(c100,68) 105,68 105,5 cw(c100,5) 100,0

## Silkscreen, mask and mechanical layers (free items; w line width, h text height)
Top Overlay:
  text "Robot Controller / Sumrath Kaur" at 13,62 h1.2
Board Shape:
  the board outline again, w0.254

## Text inside footprints (layer, text, board x,y; h text height)
U3: Top Overlay "*" at 79.086,25.865 h1.27; Top 3D Body "*" at 80.356,25.865 h1.27